# Altium PCB Board1.pcbdoc (part 2 of 2)
Units mil, origin at the board's own origin, x right, y up, seen from the top; angles counter-clockwise.
Board outline 3515.7 x 2641.7 mil, 2 copper layers (Top Layer, Bottom Layer), stack 62.2 mil thick; 78 components, 74 nets, 384 pads, 165 vias.
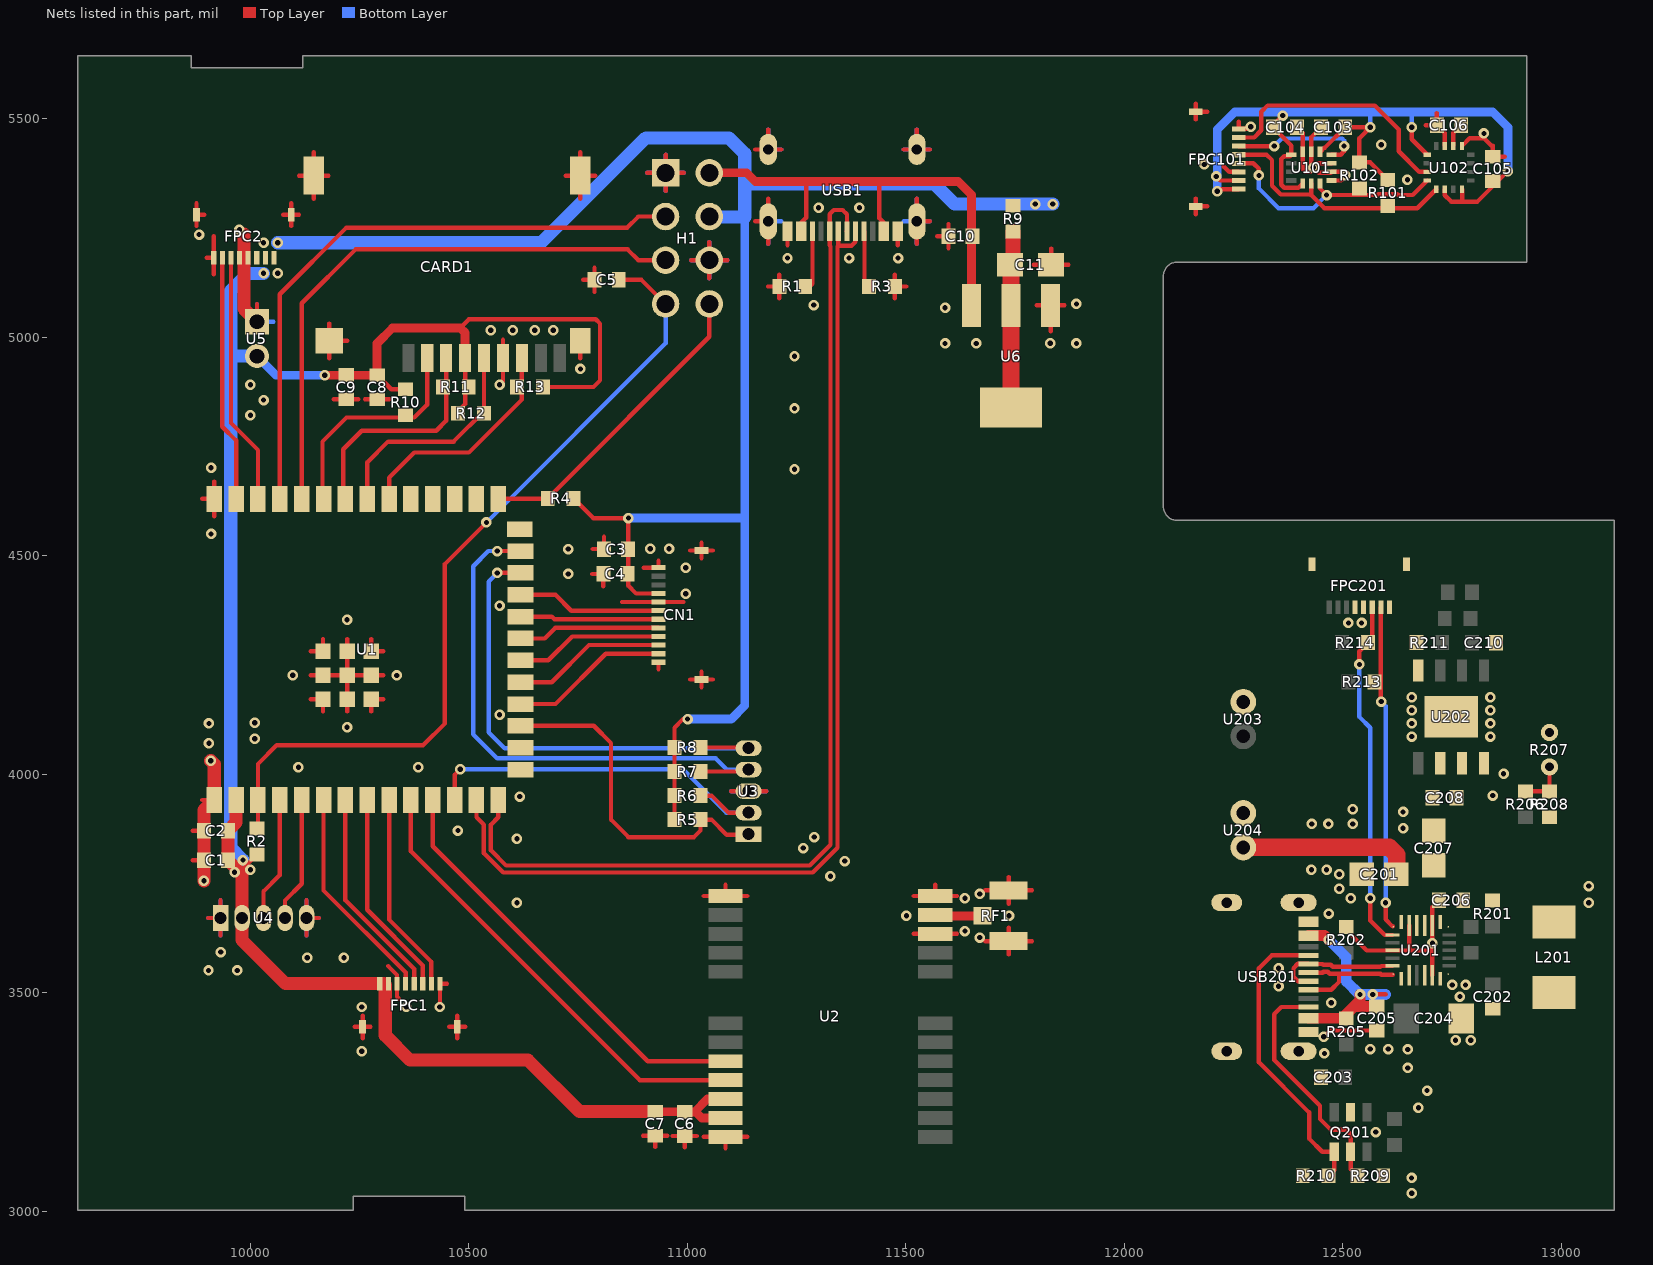
[diagram p2: the nets of this part, all layers, seen from the top]

## Via types
v1: diameter 24, hole 12, Top Layer to Bottom Layer, 165 vias

## Nets (pads, with @x,y where several pads share a name; then routed paths per layer and width w, separated by ;. In a path a pad name is that pad's centre, name@x,y a point inside that pad or via, vN(x,y) a via of type N, cw(c..) or ccw(c..) an arc to the next point about the centre after c; other vN are vias at no path point) (continued)
BAT/$1N68: R206.2 R207.1 R208.1 | length 113
  Top Layer w10: R206.2@12917.6,3960.6 R208.1@12972.6,3960.6 12972.6,4011.5 R207.1@12967.6,4016.5
BAT/CC1: Q201.4 R210.1 USB201.A5 | length 693.6
  Top Layer w10: USB201.A5@12421.1,3585.1 12336.8,3585.1 12307.6,3555.9 12307.6,3340.9 12422.6,3225.9 12422.6,3165.9 12452.8,3135.7 Q201.4@12480.2,3135.7 12480.2,3093.8 R210.1@12467.2,3080.9
BAT/CC2: Q201.5 R209.1 USB201.B5 | length 554.5
  Top Layer w10: USB201.B5@12421.1,3467 12358.7,3467 12342.6,3450.9 12342.6,3345.9 12447.6,3240.9 12447.6,3210.9 12472.6,3185.9 12507.6,3185.9 12517.6,3175.9 Q201.5@12517.6,3135.7 12517.6,3096.2 R209.1@12532.9,3080.9
BAT/GND: C201.2 C203.2 C204.2 C205.1 C206.2 C207.1 C208.1 C210.1 FPC201.1 FPC201.4 FPC201.5 FPC201.9 FPC201.10 Q201.2 R202.2 R207.2 R208.2 R209.2 R210.2 R211.1 U201.5 U201.6 U201.7 U201.15 U201.18 U201.23 U202.4 U202.9 U203.1 U204.1 USB201.13 USB201.14 USB201.15 USB201.16 USB201.A1B12 USB201.B1A12 | length 586.5
  Top Layer w10: v1(12456.3,3398.9) 12470.7,3413.3 C205.1@12577.6,3413.3 ; R202.2@12507.6,3650.6 12507.6,3643.4 12554.5,3596.5 12613.1,3596.5 12651.5,3596.5 ; U201.18@12651.5,3653.6 12651.5,3596.5 ; U201.5@12704.7,3539.4 12704.7,3595.2 ; C206.2@12720,3710.9 12704.7,3695.6 U201.15@12704.7,3653.6 v1(12704.7,3613.1) 12704.7,3595.2 ; 12651.5,3596.5 12703.5,3596.5 12704.7,3595.2
  other v1: 12657.6,3040.9 12657,3075.9 12575.2,3180.9 12672.6,3236.3 12692.6,3275.9 12648.4,3327.7 12457.6,3360.9 12648.4,3370 12562.6,3370.9 12603.8,3370.9 12757.6,3390.9 12792.6,3390.9 12473,3476.6 12767.6,3490.9 12352.6,3514.8 12750.1,3517.7 12780.7,3517.7 12352.6,3555.9 12467.6,3680.9 13062.6,3705.9 12517.6,3715.9 12491.5,3737.5 13062.6,3743.9 12491.5,3770.9 12428,3780.9 12462.6,3780.9 12637.6,3875.9 12428.6,3885.9 12466.7,3885.9 12522.6,3885.9 12637.6,3913.4 12522.6,3919.7 12842.6,3950.9 12867.6,4000.9 12657.6,4085.9 12837.6,4085.9 12657.6,4115.9 12837.6,4115.9 12657.6,4145.9 12837.6,4145.9 12657.6,4175.9 12837.6,4175.9 12512.6,4345.9 12542.6,4345.9
BAT/P_DN: U201.25 USB201.A7 USB201.B7 | length 292.5
  Top Layer w10: USB201.A7@12421.1,3526.1 12420.9,3525.9 12397,3525.9 12386.7,3536.2 12386.7,3555.9 12396.7,3565.9 12420.6,3565.9 USB201.B7@12421.1,3565.4 12453.5,3565.4 12455.3,3563.6 12472,3563.6 12476.4,3559.2 12585.5,3559.2 12587.4,3561 U201.25@12613.1,3561
BAT/P_DP: U201.1 U201.26 USB201.A6 USB201.B6 | length 292.1
  Top Layer w10: USB201.B6@12421.1,3506.4 12473,3506.4 12491,3524.3 12491,3543.2 ; USB201.A6@12421.1,3545.7 12453.5,3545.7 12455.3,3547.6 12465.3,3547.6 12469.8,3543.2 12491,3543.2 ; 12613.6,3541.3 12587.9,3541.3 12586,3543.2 12491,3543.2
BAT/SCL_B: FPC201.2 R213.2 U201.19 U201.20 | length 741.2
  Top Layer w10: FPC201.2@12586.8,4381.7 12586.8,4166.7 v1(12587.6,4165.9) ; v1(12597.6,3705.9) 12597.6,3667.7 12613.6,3651.6
  Bottom Layer w10: v1(12587.6,4165.9) 12597.6,4155.9 v1(12597.6,3705.9)
BAT/SDA_B: FPC201.3 R214.2 U201.21 | length 803.5
  Top Layer w10: v1(12537.6,4250.9) 12537.6,4280.9 12567.1,4310.4 FPC201.3@12567.1,4381.7 ; v1(12562.6,3715.9) 12562.6,3665 12595.7,3631.9 U201.21@12613.1,3631.9
  Bottom Layer w10: v1(12537.6,4250.9) 12537.6,4130.9 12562.6,4105.9 v1(12562.6,3715.9)
BAT/SW: C202.1 L201.2 U201.4
BAT/SYS: C207.2 C208.2 L201.1 U201.16 U202.6 U202.7 U202.8
BAT/VBAT: C201.1 U201.17 U204.2 | length 402.8
  Top Layer w40: U204.2@12271.9,3832.2 12606.3,3832.2 12622.6,3815.9 12622.6,3771.5 C201.1@12621.9,3770.9
BAT/VBUS: C205.2 R205.2 U201.2 USB201.A4B9 USB201.B4A9 | length 490.4
  Top Layer w10: v1@12572.6,3495.9 12597.6,3495.9
  Top Layer w25: USB201.B4A9@12421.1,3441.4 12498.1,3441.4 12525.1,3468.5 ; USB201.A4B9@12421.1,3630.4 12458.1,3630.4 v1(12467.6,3620.9) ; v1(12539.1,3495.9) 12539.1,3482.4 12525.1,3468.5 ; C205.2@12577.6,3468.5 12525.1,3468.5
  Bottom Layer w25: v1(12467.6,3620.9) 12507.6,3580.9 12507.6,3525.9 12537.6,3495.9 v1(12539.1,3495.9) v1(12568.1,3495.9) 12597.6,3495.9
BAT/VREF: C206.1 R201.1 U201.13 U201.14
MCU/3V3: C1.1 C2.1 C3.2 C4.2 C6.2 C7.2 C8.2 C9.2 CARD1.4 CN1.9 FPC1.1 FPC1.2 FPC2.1 FPC2.2 FPC2.3 H1.4 R2.2 R4.1 R5.1 R6.1 R7.1 R8.1 R9.1 R10.2 R11.2 R12.2 R13.2 U1.2 U2.22 U2.23 U4.2 U5.2 | length 9032.1
  Top Layer w10: 9980.8,3771.2 9980.8,3782 R2.2@10015,3816.2 ; C8.2@10289.9,4912.9 10322.2,4880.6 R10.2@10355,4880.6 ; R12.2@10475.3,4830.9 10491.3,4846.9 CARD1.4@10491.3,4952.2 ; 10480,5020.9 10500,5040.9 10790,5040.9 10800,5030.9 10800,4900.9 10785,4885.9 R13.2@10669.7,4885.9 ; R4.1@10739.7,4630.9 10784.7,4585.9 v1(10865,4585.9) 10865,4430.9 10882.5,4413.4 CN1.9@10933.7,4413.4 ; R5.1@10970.3,3895.9 R6.1@10970.3,3950.9 R7.1@10970.3,4005.9 R8.1@10970.3,4060.9 10970.3,4106.2 10990,4125.9 v1(11000.3,4125.9)
  Top Layer w20: v1(10170,4912.9) C8.2@10289.9,4912.9 10289.9,4985.8 10325,5020.9 10480,5020.9 10491.3,5009.6 CARD1.4@10491.3,4952.2 ; C7.2@10926,3227.6 10993,3227.6 C6.2@10993.7,3227 11016.1,3227 ; U2.23@11087.1,3213.1 11032.8,3213.1 11018.9,3227 11016.1,3227 ; U2.22@11087.1,3256.5 11045.5,3256.5 11016.1,3227
  Top Layer w30: U1.2@9967.3,3940.9 9967.3,3889.4 C2.1@9948.7,3870.8 C1.1@9948.7,3803.2 9980.8,3771.2 U4.2@9980.8,3670.9 9980.8,3620.1 10080,3520.9 10305,3520.9 10308.6,3517.3 10308.6,3402.3 10365,3345.9 10635,3345.9 10753.3,3227.6 C7.2@10926,3227.6
  Bottom Layer w20: U5.2@10015,4956.5 10058.7,4912.9 v1(10170,4912.9) ; v1(10865,4585.9) 11131.2,4585.9 ; v1(11000.3,4125.9) 11100,4125.9 11131.2,4157.1 11131.2,4585.9 ; 11131.2,5274.7 11131.2,4585.9
  Bottom Layer w30: v1(9982.9,3803.2) 9955,3831.1 9955,4954.3 ; U5.2@10015,4956.5 9957.2,4956.5 9955,4954.3 ; v1(10030,5145.9) 9995,5145.9 9955,5105.9 9955,4954.3 ; v1(10062.5,5215.9) 10665,5215.9 10905,5455.9 11095,5455.9 11131.2,5419.7 11131.2,5362.4 ; H1.4@11050,5275.9 11051.2,5274.7 11131.2,5274.7 11131.2,5362.4 ; v1(11836.1,5304.4) v1(11796.1,5304.4) 11611.5,5304.4 11565,5350.9 11142.7,5350.9 11131.2,5362.4
  other v1: 9963.7,3775.3 10000,3780.9 10062.8,5145.9 10030,5215.9
MCU/3V3L: C11.1 R9.2 U6.2 U6.4 | length 406.3
  Top Layer w35: C11.1@11737.8,5165.9 11745,5173.1 R9.2@11745,5241.2
  Top Layer w40: C11.1@11737.8,5165.9 11740.4,5163.3 U6.2@11740.4,5072.8 U6.4@11740.4,4839
MCU/5V: C10.2 H1.2 U6.3 USB1.A4B9 USB1.B4A9 | length 1109.9
  Top Layer w10: USB1.B4A9@11260.5,5242.4 11260.5,5261.9 11271.6,5273 11271.6,5355.9 ; 11438.6,5355.9 11439.2,5355.4 11439.2,5272.3 11449.5,5261.9 USB1.A4B9@11449.5,5242.4
  Top Layer w20: H1.2@11050,5375.9 11135,5375.9 11155,5355.9 11271.6,5355.9 11438.6,5355.9 11620,5355.9 11649.9,5326 U6.3@11649.9,5072.8
MCU/$1N51: RF1.1 U2.11 | length 108.3
  Top Layer w20.6: U2.11@11567.4,3677.7 11569.2,3675.9 RF1.1@11675,3675.9
MCU/$1N182: R3.1 USB1.A5 | length 127
  Top Layer w10: USB1.A5@11404.2,5242.4 11405.3,5241.3 R3.1@11405.3,5115.9
MCU/$1N183: R1.1 USB1.B5 | length 129.2
  Top Layer w10: R1.1@11279.7,5115.9 11286.1,5122.3 USB1.B5@11286.1,5242.4
MCU/DN: U1.13 USB1.A7 USB1.B7 | length 2459
  Top Layer w10: U1.13@10517.3,3940.9 10517.3,3901.4 10534.3,3884.4 10534.3,3819 10578.4,3774.9 11286.6,3774.9 11343.3,3831.6 11343.3,5208.1 11345.2,5210 ; USB1.A7@11345.2,5242.4 11345.2,5210 ; USB1.B7@11384.5,5242.4 11384.5,5218.2 11375.3,5209 11346.1,5209 11345.2,5210
MCU/DP: U1.14 USB1.A6 USB1.B6 | length 2463.4
  Top Layer w10: U1.14@10567.3,3940.9 10567.3,3901.4 10550.3,3884.4 10550.3,3825.6 10585,3790.9 11280,3790.9 11327.3,3838.2 11327.3,5208.1 11325.5,5210 USB1.B6@11325.5,5242.4 11325.5,5281.4 11335,5290.9 11355,5290.9 11365,5280.9 11365,5242.6 USB1.A6@11364.8,5242.4
MCU/EN: C5.2 H1.7 R2.1 U1.3 | length 1914
  Top Layer w10: R2.1@10015,3875.6 10017.3,3877.9 U1.3@10017.3,3940.9 10017.3,4023.2 10060,4065.9 10395,4065.9 10445,4115.9 10445,4480.9 v1(10540,4575.9) ; C5.2@10842.6,5130.9 10895,5130.9 H1.7@10950,5075.9
  Bottom Layer w10: v1(10540,4575.9) 10950,4985.9 H1.7@10950,5075.9
MCU/GND: C1.2 C2.2 C3.1 C4.1 C5.1 C6.1 C7.1 C8.1 C9.1 C10.1 C11.2 CARD1.6 CARD1.10 CARD1.11 CARD1.12 CARD1.13 CN1.1 CN1.8 CN1.12 CN1.13 CN1.14 FPC1.3 FPC1.8 FPC1.9 FPC1.10 FPC2.4 FPC2.5 FPC2.8 FPC2.9 FPC2.10 H1.1 H1.6 R1.2 R3.2 RF1.2 RF1.3 U1.1 U1.40 U1.41 U2.10 U2.12 U2.13 U2.24 U3.3 U4.1 U4.5 U5.1 U6.1 USB1.13 USB1.14 USB1.15 USB1.16 USB1.A1B12 USB1.B1A12 | length 7199.2
  Top Layer w10: 9867.8,3803.2 C1.2@9893.6,3803.2 ; 9867.8,3870.8 C2.2@9893.6,3870.8 9893.6,3843 ; 9876.7,5254.3 FPC2.9@9876.7,5280.1 ; 9876.7,5306 FPC2.9@9876.7,5280.1 ; 9889.5,3940.9 U1.1@9917.3,3940.9 9917.3,3980.6 ; 9889.5,4629.9 U1.40@9917.3,4629.9 ; 9893.6,3775.4 C1.2@9893.6,3803.2 ; 9893.6,3831 C1.2@9893.6,3803.2 ; 9894.7,5280.1 FPC2.9@9876.7,5280.1 ; 9900.1,5181.7 FPC2.8@9910.2,5181.7 ; 9903.8,3670.9 U4.1@9931.6,3670.9 ; 9916.1,5143.7 9916.1,5230.9 ; 9917.3,4590.3 U1.40@9917.3,4629.9 ; 9917.3,4669.6 U1.40@9917.3,4629.9 ; 9931.6,3630.8 U4.1@9931.6,3670.9 ; 9931.6,3711 U4.1@9931.6,3670.9 ; FPC2.5@9975.2,5181.7 9975.2,5245.7 9994.8,5226.1 FPC2.4@9994.8,5181.7 ; U5.1@10015,5035.3 10015,5074.9 ; 10075.3,5280.1 FPC2.10@10093.3,5280.1 ; 10093.3,5254.3 FPC2.10@10093.3,5280.1 ; 10093.3,5306 FPC2.10@10093.3,5280.1 ; 10111.2,5280.1 FPC2.10@10093.3,5280.1 ; 10111.2,5369.6 CARD1.12@10144.9,5369.6 ; 10128.4,3630.8 U4.5@10128.4,3670.9 ; 10128.4,3711 U4.5@10128.4,3670.9 ; 10138.3,4171.3 U1.41@10166.1,4171.3 10166.1,4143.4 ; 10138.3,4226.4 U1.41@10166.1,4226.4 U1.41@10221.2,4226.4 ; 10138.3,4281.5 U1.41@10166.1,4281.5 10166.1,4309.3 ; 10144.9,5316.2 CARD1.12@10144.9,5369.6 ; 10144.9,5423 CARD1.12@10144.9,5369.6 ; 10156.2,3670.9 U4.5@10128.4,3670.9 ; 10178.6,5369.6 CARD1.12@10144.9,5369.6 ; 10180.3,4952 CARD1.13@10180.3,4991.6 ; 10180.3,5031.2 CARD1.13@10180.3,4991.6 ; 10191.1,4858 C9.1@10218.9,4858 10246.7,4858 ; 10221.2,4143.4 U1.41@10221.2,4171.3 U1.41@10221.2,4226.4 ; 10221.2,4309.3 U1.41@10221.2,4281.5 U1.41@10221.2,4226.4 ; 10221.9,4991.6 CARD1.13@10180.3,4991.6 ; 10238.8,3421.7 FPC1.10@10256.7,3421.7 ; 10256.7,3395.8 FPC1.10@10256.7,3421.7 ; 10256.7,3447.5 FPC1.10@10256.7,3421.7 ; 10262.1,4857.7 C8.1@10289.9,4857.7 10317.7,4857.7 ; 10274.7,3421.7 FPC1.10@10256.7,3421.7 ; 10276.3,4143.4 U1.41@10276.3,4171.3 10304.2,4171.3 ; 10276.3,4309.3 U1.41@10276.3,4281.5 10304.2,4281.5 ; 10304.2,4226.4 U1.41@10276.3,4226.4 U1.41@10221.2,4226.4 ; 10315,3560.9 10335.5,3540.4 FPC1.3@10335.5,3520.1 10335.5,3490.4 10340,3485.9 ; v1(10433.4,3467.1) 10433.9,3467.6 FPC1.8@10433.9,3520.1 ; 10439.8,3520.1 10449.9,3520.1 ; 10455.3,3421.7 FPC1.9@10473.3,3421.7 ; 10473.3,3395.8 FPC1.9@10473.3,3421.7 ; 10473.3,3447.5 FPC1.9@10473.3,3421.7 ; 10491.2,3421.7 FPC1.9@10473.3,3421.7 ; v1(10570,4890.9) 10578,4898.9 CARD1.6@10578,4952.2 ; 10578,4910.6 CARD1.6@10578,4952.2 ; 10578,4993.8 CARD1.6@10578,4952.2 ; 10721.4,5369.6 CARD1.11@10755.1,5369.6 ; 10755.1,4952 CARD1.10@10755.1,4991.6 ; 10755.1,5316.2 CARD1.11@10755.1,5369.6 ; 10755.1,5423 CARD1.11@10755.1,5369.6 ; 10761.6,5130.9 C5.1@10787.4,5130.9 ; 10782,4458 C4.1@10807.8,4458 10807.8,4430.2 ; 10783.2,4515 C3.1@10809.1,4515 10809.1,4542.9 ; 10787.4,5103.1 C5.1@10787.4,5130.9 ; 10787.4,5158.7 C5.1@10787.4,5130.9 ; 10788.8,5369.6 CARD1.11@10755.1,5369.6 ; 10850.3,4393.7 10991,4393.7 ; 10898.2,3172.5 C7.1@10926,3172.5 ; 10900,4472.4 CN1.12@10933.7,4472.4 ; 10908.4,5375.9 H1.1@10950,5375.9 ; 10926,3146.7 C7.1@10926,3172.5 ; 10933.7,4239.9 CN1.1@10933.7,4250 ; 10933.7,4478.3 10933.7,4488.4 ; 10950,5334.3 H1.1@10950,5375.9 ; 10950,5417.5 H1.1@10950,5375.9 ; 10953.8,3172.5 C7.1@10926,3172.5 ; 10965.9,3171.9 C6.1@10993.7,3171.9 ; 10991.6,5375.9 H1.1@10950,5375.9 ; 10993.7,3146 C6.1@10993.7,3171.9 ; 11006.3,4216.5 CN1.14@11032.2,4216.5 ; 11006.3,4511.8 CN1.13@11032.2,4511.8 ; 11008.4,5175.9 H1.6@11050,5175.9 ; 11021.5,3171.9 C6.1@10993.7,3171.9 ; 11032.2,4198.6 CN1.14@11032.2,4216.5 ; 11032.2,4234.5 CN1.14@11032.2,4216.5 ; 11032.2,4493.8 CN1.13@11032.2,4511.8 ; 11032.2,4529.8 CN1.13@11032.2,4511.8 ; 11037.6,3169.8 U2.24@11087.1,3169.8 ; 11037.6,3721 U2.13@11087.1,3721 ; 11050,5134.3 H1.6@11050,5175.9 ; 11050,5217.5 H1.6@11050,5175.9 ; 11058,4216.5 CN1.14@11032.2,4216.5 ; 11058,4511.8 CN1.13@11032.2,4511.8 ; 11087.1,3144 U2.24@11087.1,3169.8 ; 11087.1,3746.9 U2.13@11087.1,3721 ; 11091.6,5175.9 H1.6@11050,5175.9 ; 11099.9,3960.9 U3.3@11140,3960.9 11180.1,3960.9 ; 11136.5,3169.8 U2.24@11087.1,3169.8 ; 11136.5,3721 U2.13@11087.1,3721 ; 11155.1,5264.8 USB1.13@11184.9,5264.8 ; 11155.1,5429.4 USB1.14@11184.9,5429.4 ; 11184.4,5115.9 R1.2@11210.3,5115.9 ; 11184.9,5213.4 USB1.13@11184.9,5264.8 ; 11184.9,5316.3 USB1.13@11184.9,5264.8 ; 11184.9,5474.9 USB1.14@11184.9,5429.4 ; 11210.3,5088.8 R1.2@11210.3,5115.9 ; 11210.3,5143 R1.2@11210.3,5115.9 ; 11214.7,5429.4 USB1.14@11184.9,5429.4 ; 11229,5209.9 USB1.B1A12@11229,5242.4 ; 11474.7,5088.8 R3.2@11474.7,5115.9 ; 11474.7,5143 R3.2@11474.7,5115.9 ; 11481,5209.9 USB1.A1B12@11481,5242.4 ; 11495.3,5429.4 USB1.15@11525.1,5429.4 ; 11500.6,5115.9 R3.2@11474.7,5115.9 ; 11517.9,3634.4 U2.10@11567.4,3634.4 11616.8,3634.4 ; 11517.9,3721 U2.12@11567.4,3721 ; 11525.1,5213.4 USB1.16@11525.1,5264.8 ; 11525.1,5316.3 USB1.16@11525.1,5264.8 ; 11525.1,5474.9 USB1.15@11525.1,5429.4 ; 11554.9,5264.8 USB1.16@11525.1,5264.8 ; 11554.9,5429.4 USB1.15@11525.1,5429.4 ; 11567.4,3746.9 U2.12@11567.4,3721 ; 11571.6,5230.9 C10.1@11597.4,5230.9 ; 11597.4,5203.1 C10.1@11597.4,5230.9 ; 11597.4,5258.7 C10.1@11597.4,5230.9 ; 11616.8,3721 U2.12@11567.4,3721 ; 11681.6,3617.8 RF1.2@11735,3617.8 ; 11681.6,3734 RF1.3@11735,3734 ; 11735,3587.1 RF1.2@11735,3617.8 ; 11735,3648.6 RF1.2@11735,3617.8 ; 11735,3703.2 RF1.3@11735,3734 ; 11735,3764.7 RF1.3@11735,3734 ; 11788.4,3617.8 RF1.2@11735,3617.8 ; 11788.4,3734 RF1.3@11735,3734 ; 11792.6,5165.9 C11.2@11832.2,5165.9 ; 11799.2,5072.8 U6.1@11831,5072.8 ; 11831,5013.5 U6.1@11831,5072.8 ; 11832.2,5202.8 C11.2@11832.2,5165.9 ; 11862.7,5072.8 U6.1@11831,5072.8 ; 11871.9,5165.9 C11.2@11832.2,5165.9
  Top Layer w30: v1(9893.6,3755.9) C1.2@9893.6,3803.2 C2.2@9893.6,3870.8 9893.6,3917.3 U1.1@9917.3,3940.9 9917.3,4022.6 v1(9909.2,4030.7) ; 9985,5235.9 9985,5065.3 U5.1@10015,5035.3
  Bottom Layer w10: 9903.8,3670.9 U4.1@9931.6,3670.9 ; 9931.6,3630.8 U4.1@9931.6,3670.9 ; 9931.6,3711 U4.1@9931.6,3670.9 ; 10015,5074.9 U5.1@10015,5035.3 10052.7,5035.3 ; 10128.4,3630.8 U4.5@10128.4,3670.9 ; 10128.4,3711 U4.5@10128.4,3670.9 ; 10156.2,3670.9 U4.5@10128.4,3670.9 ; 10908.4,5375.9 H1.1@10950,5375.9 ; 10950,5334.3 H1.1@10950,5375.9 ; 10950,5417.5 H1.1@10950,5375.9 ; 10991.6,5375.9 H1.1@10950,5375.9 ; 11008.4,5175.9 H1.6@11050,5175.9 ; 11050,5134.3 H1.6@11050,5175.9 ; 11050,5217.5 H1.6@11050,5175.9 ; 11091.6,5175.9 H1.6@11050,5175.9 ; 11099.9,3960.9 U3.3@11140,3960.9 11180.1,3960.9 ; 11184.9,5213.4 USB1.13@11184.9,5264.8 11214.7,5264.8 ; 11184.9,5474.9 USB1.14@11184.9,5429.4 11214.7,5429.4 ; 11495.3,5264.8 USB1.16@11525.1,5264.8 ; 11495.3,5429.4 USB1.15@11525.1,5429.4 ; 11525.1,5213.4 USB1.16@11525.1,5264.8 ; 11525.1,5316.3 USB1.16@11525.1,5264.8 ; 11525.1,5474.9 USB1.15@11525.1,5429.4 ; 11554.9,5264.8 USB1.16@11525.1,5264.8 ; 11554.9,5429.4 USB1.15@11525.1,5429.4
  other v1: 10255,3365.9 10255,3467.1 10356.5,3467.1 9904.1,3550.9 9970,3550.9 10129.8,3579.6 10213.9,3579.6 9931.9,3592.9 11669,3625.9 11635,3640.9 11501.1,3675.9 11735.9,3675.9 10610,3705.9 11635,3715.9 11669,3725.9 11327.2,3766.5 11360,3800.9 11265,3830.9 10610,3851.9 11290,3855.9 10475,3870.9 10616.5,3948.6 10110,4015.9 10384.3,4015.9 9905,4070.9 10010,4080.9 10221.2,4107.1 9905,4115.9 10010,4117.3 10570,4135.9 10096.7,4226.4 10335,4225.9 10221.2,4353.2 10570,4385.4 10996.3,4412.6 10727.2,4458 10996.3,4472.4 10727.2,4515 10915,4515.9 10958,4515.9 9910,4549.7 11245,4697.7 9910,4700.9 10000,4820.9 11245,4836.7 10030,4855.9 10000,4890.9 10755.1,4927.2 11245,4955.9 11589.4,4985.6 11661.1,4985.6 11830,4985.9 11890,4985.6 10550,5015.9 10600.4,5015.9 10650.4,5015.9 10693.2,5015.9 11589.4,5066.9 11289,5073.4 11890,5075.9 11229,5180.9 11370,5180.9 11482,5180.9 9882.6,5234.7 9975,5245.9 11300,5295.9 11393.6,5295.9
MCU/GPIO_00: H1.8 R4.2 U1.27 | length 711.6
  Top Layer w10: U1.27@10567.3,4629.9 10679.4,4629.9 R4.2@10680.3,4630.9 11050,5000.6 H1.8@11050,5075.9
MCU/GPIO_01: FPC2.7 U1.39 | length 564.8
  Top Layer w10: FPC2.7@9935.8,5181.7 9935.8,4795.1 9967.3,4763.6 U1.39@9967.3,4629.9
MCU/GPIO_02: FPC2.6 U1.38 | length 577.4
  Top Layer w10: FPC2.6@9955.5,5181.7 9955.5,4803.3 10017.3,4741.5 U1.38@10017.3,4629.9
MCU/GPIO_03: U1.15
MCU/GPIO_04: U1.4 U4.3 | length 285.5
  Top Layer w10: U4.3@10030,3670.9 10030,3731.6 10067.3,3768.9 U1.4@10067.3,3940.9
MCU/GPIO_05: U1.5 U4.4 | length 285.8
  Top Layer w10: U4.4@10079.2,3670.9 10079.2,3710.9 10117.3,3749 U1.5@10117.3,3940.9
MCU/GPIO_06: FPC1.4 U1.6 | length 498.7
  Top Layer w10: U1.6@10167.3,3940.9 10167.3,3733.7 10355.2,3545.9 FPC1.4@10355.2,3520.1
MCU/GPIO_07: FPC1.5 U1.7 | length 486
  Top Layer w10: U1.7@10217.3,3940.9 10217.3,3711.6 10374.8,3554 FPC1.5@10374.8,3520.1
MCU/GPIO_08: R6.2 U1.12 U3.2 | length 902.9
  Top Layer w10: U1.12@10467.3,3940.9 10467.3,3998.2 v1(10480,4010.9) ; R6.2@11029.7,3950.9 11055,3950.9 11094.2,3911.7 U3.2@11140,3911.7
  Bottom Layer w10: v1(10480,4010.9) 10990,4010.9 11089.2,3911.7 U3.2@11140,3911.7
MCU/GPIO_09: R5.2 U1.17 U3.1 | length 777
  Top Layer w10: U1.17@10617.7,4110.4 10785.5,4110.4 10825,4070.9 10825,3895.9 10865,3855.9 11015,3855.9 11030,3870.9 11030,3895.6 R5.2@11029.7,3895.9 11055,3895.9 11090,3860.9 11138.4,3860.9 U3.1@11140,3862.5
MCU/GPIO_10: CN1.2 U1.18 | length 363.7
  Top Layer w10: U1.18@10617.7,4160.4 10698,4160.4 10813.1,4275.6 CN1.2@10933.7,4275.6
MCU/GPIO_11: CN1.3 U1.19 | length 351.2
  Top Layer w10: U1.19@10617.7,4210.4 10689.8,4210.4 10774.7,4295.3 CN1.3@10933.7,4295.3
MCU/GPIO_12: CN1.4 U1.20 | length 338.6
  Top Layer w10: U1.20@10617.7,4260.4 10681.7,4260.4 10736.2,4315 CN1.4@10933.7,4315
MCU/GPIO_13: CN1.5 U1.21 | length 326
  Top Layer w10: U1.21@10617.7,4310.4 10673.5,4310.4 10697.7,4334.6 CN1.5@10933.7,4334.6
MCU/GPIO_14: CN1.6 U1.22 | length 318.5
  Top Layer w10: U1.22@10617.7,4360.4 10689.8,4360.4 10695.9,4354.3 CN1.6@10933.7,4354.3
MCU/GPIO_15: FPC1.6 U1.8 | length 473.5
  Top Layer w10: U1.8@10267.3,3940.9 10267.3,3689.4 10394.5,3562.2 FPC1.6@10394.5,3520.1
MCU/GPIO_16: FPC1.7 U1.9 | length 460.9
  Top Layer w10: U1.9@10317.3,3940.9 10317.3,3667.3 10414.2,3570.3 FPC1.7@10414.2,3520.1
MCU/GPIO_17: U1.10 U2.21 | length 1054.1
  Top Layer w10: U1.10@10367.3,3940.9 10367.3,3823.6 10891.1,3299.8 U2.21@11087.1,3299.8
MCU/GPIO_18: U1.11 U2.20 | length 979.5
  Top Layer w10: U1.11@10417.3,3940.9 10417.3,3834.9 10909.1,3343.1 U2.20@11087.1,3343.1
MCU/GPIO_21: CN1.7 U1.23 | length 331.1
  Top Layer w10: U1.23@10617.7,4410.4 10698,4410.4 10734.4,4374 CN1.7@10933.7,4374
MCU/GPIO_35: U1.28
MCU/GPIO_36: U1.29
MCU/GPIO_37: U1.30
MCU/GPIO_38: U1.31
MCU/GPIO_39: CARD1.7 R13.1 U1.32 | length 521.4
  Top Layer w10: U1.32@10317.3,4629.9 10317.3,4678.2 10375,4735.9 10500,4735.9 10621.3,4857.2 CARD1.7@10621.3,4952.2
MCU/GPIO_40: CARD1.5 R12.1 U1.33 | length 520.9
  Top Layer w10: U1.33@10267.3,4629.9 10267.3,4713.2 10315,4760.9 10465,4760.9 10534.6,4830.5 CARD1.5@10534.6,4952.2
MCU/GPIO_41: CARD1.3 R11.1 U1.34 | length 521.6
  Top Layer w10: U1.34@10217.3,4629.9 10212.3,4634.9 10212.3,4743.2 10255,4785.9 10425,4785.9 10448,4808.9 CARD1.3@10448,4952.2
MCU/GPIO_42: CARD1.2 R10.1 U1.35 | length 513.3
  Top Layer w10: U1.35@10167.3,4629.9 10165,4632.2 10165,4760.9 10220,4815.9 10375,4815.9 10404.7,4845.6 CARD1.2@10404.7,4952.2
MCU/GPIO_45: U1.26
MCU/GPIO_46: U1.16
MCU/GPIO_47: R8.2 U1.24 U3.5 | length 1146.6
  Top Layer w10: v1(10565,4460.4) U1.24@10617.7,4460.4 ; R8.2@11029.7,4060.9 11138.4,4060.9 U3.5@11140,4059.3
  Bottom Layer w10: v1(10565,4460.4) 10545,4440.4 10545,4095.9 10581.6,4059.3 U3.5@11140,4059.3
MCU/GPIO_48: R7.2 U1.25 U3.4 | length 1282.5
  Top Layer w10: v1(10565,4510.4) U1.25@10617.7,4510.4 ; R7.2@11029.7,4005.9 11135.8,4005.9 U3.4@11140,4010.1
  Bottom Layer w10: v1(10565,4510.4) 10544.5,4510.4 10510,4475.9 10510,4090.9 10565,4035.9 11065,4035.9 11090.8,4010.1 U3.4@11140,4010.1
MCU/RXD0: H1.5 U1.36 | length 1341.5
  Top Layer w10: U1.36@10117.3,4629.9 10117.3,5077.5 10240.4,5200.6 10863.1,5200.6 10887.8,5175.9 H1.5@10950,5175.9
MCU/TXD0: H1.3 U1.37 | length 1424.6
  Top Layer w10: U1.37@10067.3,4629.9 10067.3,5098.2 10219.6,5250.6 10862.4,5250.6 10887.8,5275.9 H1.3@10950,5275.9
MMU/3V3: C103.2 C104.2 C105.2 FPC101.7 FPC101.8 R101.1 R102.1 U101.5 U101.8 U101.12 U102.2 U102.4 U102.13 | length 1983.5
  Top Layer w10: v1(12210.1,5367.5) 12219.3,5358.3 FPC101.7@12261.8,5358.3 ; v1(12212.6,5333.6) 12217.6,5338.6 FPC101.8@12261.8,5338.6 ; v1(12362.1,5507) 12340,5484.9 C104.2@12340,5480 12381.8,5438.2 U101.8@12381.8,5417.3 12378.4,5414 12365.4,5414 12359,5407.5 12359,5348.4 12365.4,5342 12398.1,5342 12407.7,5351.6 U101.12@12408.1,5351.6 ; U101.5@12447.5,5424 12447.9,5424 12457.5,5433.6 12458.8,5433.6 C103.2@12505.1,5480 v1(12562.6,5480) 12537.6,5455 R102.1@12537.6,5399.7 12562.6,5399.7 R101.1@12602.6,5359.7 ; v1(12657.6,5480) 12657.6,5452.8 U102.13@12693.1,5417.3 ; U102.2@12733,5338.1 12733,5324.6 12747.6,5310 12771.4,5310 ; U102.4@12772.3,5338.1 12772.6,5337.8 12772.6,5311.2 12771.4,5310 ; v1(12877.6,5380) 12807.6,5310 12771.4,5310
  Bottom Layer w10: 12560.9,5515 12562.6,5513.3 v1(12562.6,5480) ; v1(12657.6,5480) 12657.6,5512.8 12659.7,5515
  Bottom Layer w20: v1(12212.6,5333.6) 12212.6,5475 12252.6,5515 12560.9,5515 12659.7,5515 12842.6,5515 12877.6,5480 v1(12877.6,5380)
MMU/$1N27: C106.2 U102.10 | length 54.7
  Top Layer w10: U102.10@12752.6,5437.5 12752.6,5467.5 C106.2@12770.1,5485
MMU/GND: C103.1 C104.1 C105.1 C106.1 FPC101.1 FPC101.6 FPC101.9 FPC101.10 U101.1 U101.2 U101.3 U101.6 U101.7 U102.9 U102.11 | length 846
  Top Layer w10: 12163.3,5281.2 FPC101.9@12163.3,5299.2 ; 12163.3,5317.2 FPC101.9@12163.3,5299.2 ; 12163.3,5497.8 FPC101.10@12163.3,5515.8 ; 12163.3,5533.7 FPC101.10@12163.3,5515.8 ; 12189.2,5299.2 FPC101.9@12163.3,5299.2 ; 12189.2,5515.8 FPC101.10@12163.3,5515.8 ; 12227.6,5390 12239.6,5378 FPC101.6@12261.8,5378 ; FPC101.1@12261.8,5476.4 12283.9,5476.4 v1(12288.9,5481.4) ; 12261.8,5482.3 12261.8,5492.4 ; C104.1@12395.1,5480 12408.1,5467 U101.7@12408.1,5424 12408.1,5385 12415.2,5377.9 12425.2,5377.9 12432.3,5385 v1(12432.3,5387.8) ; C103.1@12450,5480 12427.8,5457.8 U101.6@12427.8,5424 12427.8,5392.3 v1(12432.3,5387.8) ; U101.1@12473.9,5358.3 12495.8,5358.3 ; U101.3@12473.9,5397.7 12442.2,5397.7 v1(12432.3,5387.8) ; 12495.8,5378 U101.2@12473.9,5378 12471.9,5375.9 12444.2,5375.9 v1(12432.3,5387.8) ; 12689.2,5485 C106.1@12715,5485 ; 12715,5512.8 C106.1@12715,5485 ; U102.11@12733,5437.5 12733,5467 C106.1@12715,5485 ; U102.9@12772.3,5437.5 12789.8,5455 12822.6,5455 12842.6,5435 C105.1@12842.6,5412.6 ; 12842.6,5438.4 C105.1@12842.6,5412.6 ; 12870.4,5412.6 C105.1@12842.6,5412.6
  other v1: 12647.6,5360 12505,5370 12182.6,5395 12587.6,5440 12822.6,5466.1
MMU/IMU_INT: FPC101.3 U101.4 | length 306.6
  Top Layer w10: FPC101.3@12261.8,5437 v1(12342.6,5437) ; U101.4@12473.9,5417.3 12494.9,5417.3 12502.6,5425 v1(12502.6,5437)
  Bottom Layer w10: v1(12342.6,5437) 12359.9,5454.3 12498.2,5454.3 12502.6,5450 v1(12502.6,5437)
MMU/MMU_INT: FPC101.2 U102.15 | length 578.8
  Top Layer w10: FPC101.2@12261.8,5456.7 12296.8,5456.7 12313.3,5473.2 12313.3,5515.7 12327.6,5530 12572.6,5530 12627.6,5475 12627.6,5425 12674.6,5378 U102.15@12693.1,5378
MMU/SCL: FPC101.4 R101.2 U101.13 U102.1 | length 581.3
  Top Layer w10: FPC101.4@12261.8,5417.3 12325.2,5417.3 12337.6,5405 12337.6,5346.3 12357.6,5326.3 12426.3,5326.3 12427.8,5324.7 ; U101.13@12427.8,5351.6 12427.8,5324.7 ; U102.1@12713.3,5338.1 12670.2,5295 12457.6,5295 12427.8,5324.7
MMU/SDA: FPC101.5 R102.2 U101.14 U102.16 | length 561.1
  Top Layer w10: FPC101.5@12261.8,5397.6 12294.9,5397.6 12307.6,5385 v1(12307.6,5370) ; U101.14@12447.5,5351.6 12447.5,5340 v1(12462.6,5325) 12578.8,5325 12581,5327.2 12624.1,5327.2 12626.3,5325 12659.8,5325 U102.16@12693.1,5358.3
  Bottom Layer w10: v1(12307.6,5370) 12307.6,5340 12352.6,5295 12432.6,5295 v1(12462.6,5325)
pads on no net: CARD1.1 CARD1.8 CARD1.CD CN1.10 CN1.11 Q201.3 U2.1 U2.2 U2.3 U2.4 U2.5 U2.6 U2.7 U2.8 U2.9 U2.14 U2.15 U2.16 U2.17 U2.18 U2.19 U101.9 U101.10 U101.11 U102.3 U102.5 U102.6 U102.7 U102.8 U102.12 U102.14 U201.9 U201.10 U202.5 USB1.A8 USB1.B8 USB201.A8 USB201.B8

## Keep-outs
Top Layer:
  region: 12880.2,3687.2 12880.2,3474.6 13084.9,3474.6 13084.9,3687.2
Board Outline Layer:
  drawing of 1081 lines, arcs and shapes, not listed
  text "CNC" at 9920,5659.4 h35.4
  text "CNC" at 12935.7,5364.2 h35.4
  text "CNC" at 12360.9,4852.4 h35.4
  text "V-CUT" at 11979,4773.6 h31.5
  text "V-CUT" at 12128.6,4773.6 h31.5
  text "CNC" at 11983,4301.2 h35.4
  text "CNC" at 10274.3,3009.8 h35.4

## Other copper
Top Layer:
  drawing of 354 lines, arcs and shapes, not listed
Bottom Layer:
  region net MCU/3V3: 10010,5195.9 10010,5225.9 10018.8,5234.7 10072.4,5234.7 10080,5227.2 10080,5135.9 10075,5130.9 10015,5130.9 10010,5135.9
  region net MCU/3V3: 9935,3819 9985.9,3819 9997.3,3830.4 10030.7,3830.4 10030.7,3796.9 9995.6,3761.8 9951.9,3761.8 9935,3778.7
  region net MCU/EN: 10955,5033 10945,5033 10943.4,5035.2 10939.2,5040.3 10926.4,5055.1 10973.6,5055.1 10960.8,5040.3 10956.6,5035.2
  region net MCU/3V3: 11093.8,5289.7 11092,5259.7 11089.5,5259.5 11086.7,5259 11083.7,5258.2 11080.6,5257.1 11077.5,5255.9 11074.6,5254.5 11072.1,5253 11069.9,5251.5 11071.7,5298.7 11073.8,5297 11076.3,5295.4 11079.1,5293.9 11082.2,5292.5 11085.3,5291.4 11088.3,5290.5 11091.2,5289.9
  region net MCU/GPIO_47: 11100.2,4054.3 11100.2,4064.3 11101.7,4064.5 11103.6,4065 11105.6,4065.7 11107.7,4066.7 11109.8,4067.8 11111.8,4069.1 11113.6,4070.4 11115.2,4071.8 11115.2,4046.8 11113.6,4048.2 11111.8,4049.6 11109.8,4050.9 11107.7,4052 11105.6,4052.9 11103.6,4053.7 11101.7,4054.2
  region net MCU/GPIO_48: 11100.2,4005.1 11100.2,4015.1 11101.7,4015.3 11103.6,4015.8 11105.6,4016.5 11107.7,4017.5 11109.8,4018.6 11111.8,4019.9 11113.6,4021.2 11115.2,4022.6 11115.2,3997.6 11113.6,3999 11111.8,4000.4 11109.8,4001.6 11107.7,4002.8 11105.6,4003.7 11103.6,4004.5 11101.7,4005
  region net MCU/GPIO_08: 11100.2,3906.7 11100.2,3916.7 11101.7,3916.9 11103.6,3917.3 11105.6,3918.1 11107.7,3919 11109.8,3920.2 11111.8,3921.4 11113.6,3922.8 11115.2,3924.2 11115.2,3899.2 11113.6,3900.6 11111.8,3901.9 11109.8,3903.2 11107.7,3904.3 11105.6,3905.3 11103.6,3906 11101.7,3906.5
  region net MCU/3V3: 9977.5,4941.5 9977.5,4971.5 9980,4971.7 9982.8,4972 9985.6,4972.6 9988.3,4973.3 9991,4974.2 9993.3,4975.1 9995.3,4976.1 9996.8,4977.2 9996.8,4935.9 9995.3,4936.9 9993.3,4937.9 9991,4938.9 9988.3,4939.8 9985.6,4940.5 9982.8,4941 9980,4941.4
  region net MCU/3V3: 10048.6,4937.1 10034.5,4922.9 10033.1,4923.9 10031.2,4924.9 10028.8,4925.8 10025.9,4926.7 10022.8,4927.6 10019.6,4928.2 10016.4,4928.7 10013.3,4929 10042.5,4958.3 10042.8,4955.1 10043.3,4951.9 10044,4948.7 10044.8,4945.6 10045.7,4942.8 10046.6,4940.3 10047.6,4938.4
  region net MCU/3V3: 10155.6,4902.9 10155.6,4922.9 10157.7,4922.9 10159.9,4923.2 10163.9,4923.9 10167.3,4924.5 10170,4924.9 10170,4900.8 10167.3,4901.2 10163.9,4901.8 10159.9,4902.5 10157.7,4902.8
  region net MCU/3V3: 10879.4,4595.9 10879.4,4575.9 10877.3,4575.8 10875.1,4575.6 10871.1,4574.9 10867.7,4574.2 10865,4573.9 10865,4597.9 10867.7,4597.6 10871.1,4596.9 10875.1,4596.2 10877.3,4596
  region net MCU/GPIO_08: 10496.3,4015.9 10496.3,4005.9 10494.5,4005.6 10492.3,4004.7 10489.9,4003.4 10487.9,4001.9 10487.9,4019.9 10489.9,4018.4 10492.3,4017.2 10494.5,4016.2
  region net MCU/GPIO_47: 10557,4445.3 10549.9,4452.4 10550.9,4453.9 10551.9,4456.2 10552.6,4458.7 10553,4461.2 10565.8,4448.4 10563.3,4448.1 10560.7,4447.3 10558.5,4446.4
  region net MCU/GPIO_48: 10548.7,4505.4 10548.7,4515.4 10550.5,4515.8 10552.7,4516.7 10555.1,4518 10557.1,4519.4 10557.1,4501.4 10555.1,4502.9 10552.7,4504.2 10550.5,4505.1
  region net MCU/3V3: 11014.7,4135.9 11014.7,4115.9 11012.6,4115.8 11010.5,4115.6 11006.5,4114.9 11003,4114.2 11000.3,4113.9 11000.3,4137.9 11003,4137.6 11006.5,4136.9 11010.5,4136.2 11012.6,4136
  region net MCU/EN: 10548,4591 10555.1,4583.9 10554.1,4582.4 10553.1,4580.2 10552.4,4577.6 10552,4575.2 10539.2,4587.9 10541.7,4588.3 10544.3,4589 10546.5,4590
  region net MCU/3V3: 10015,4971.5 10015,4941.5 10009.3,4941.2 10003.6,4940.2 9998.2,4938.5 9992.9,4936.2 9988,4933.3 9983.4,4929.9 9979.3,4925.9 9975.6,4921.5 9972.5,4916.7 9970,4911.5 9955,4954.3 9970,5001.5 9972.5,4996.4 9975.6,4991.6 9979.3,4987.1 9983.4,4983.2 9988,4979.7 9992.9,4976.8 9998.2,4974.5 10003.6,4972.9 10009.3,4971.9
  region net MCU/3V3: 11116.2,5362.4 11143.3,5265.8 11141.2,5173.5 11121.2,5169.7 11120.9,5177.9 11119.8,5186 11118,5194 11115.5,5201.8 11112.3,5209.3 11108.5,5216.5 11104.1,5223.4 11099.1,5229.9 11093.5,5235.9 11087.4,5241.3 11080.9,5246.3 11073.9,5250.6 11066.6,5254.3 11059,5257.3 11051.2,5259.7 11051.2,5289.7 11058.7,5290.9 11066.1,5292.9 11073.2,5295.7 11079.9,5299.2 11086.3,5303.4 11092.2,5308.2 11097.6,5313.6 11102.4,5319.6 11106.5,5326 11109.9,5332.7 11112.7,5339.9 11114.6,5347.2 11115.8,5354.8 11116.2,5362.4
  region net MCU/3V3: 11061.2,4595.9 11069.2,4596.2 11077.2,4597.2 11085.1,4598.8 11092.8,4601 11100.4,4603.9 11107.6,4607.3 11114.6,4611.3 11121.2,4615.9 11131.2,4585.9 11121.2,4555.9 11114.6,4560.5 11107.6,4564.5 11100.4,4567.9 11092.8,4570.8 11085.1,4573 11077.2,4574.6 11069.2,4575.6 11061.2,4575.9 11061.2,4595.9
  region net MCU/3V3: 11141.2,5234 11121.2,5234 11121.1,5249 11120.7,5264 11141.7,5264 11141.3,5249 11141.2,5234
  region net MCU/3V3: 11236.2,5335.9 11225.5,5335.5 11214.8,5334.4 11204.3,5332.5 11193.9,5329.8 11183.7,5326.4 11173.8,5322.3 11164.2,5317.5 11155,5312 11146.2,5305.9 11131.2,5350.9 11236.2,5335.9
  region net MCU/GND: 120 vertices and 18 holes, not listed, extent 9862.5,3020 11953.1,5629.6
  region net MCU/GND: 11057.1,4016.8 11077.3,3996.6 11080.2,3994.2 11083.5,3992.5 11087.1,3991.4 11090.8,3991 11099.4,3991 11100.2,3990.7 11101.4,3990.2 11102.6,3989.5 11103.8,3988.7 11104.7,3988.1 11105.5,3987.3 11106.5,3986.4 11107.5,3985.5 11104.2,3982.3 11101.3,3978.6 11099,3974.5 11097.3,3970.1 11096.2,3965.6 11095.9,3960.9 11096.2,3956.2 11097.3,3951.7 11099,3947.3 11101.3,3943.2 11104.2,3939.5 11107.6,3936.3 11106.5,3935.4 11105.5,3934.5 11104.7,3933.7 11103.8,3933.1 11102.6,3932.3 11101.4,3931.7 11100.2,3931.1 11099.3,3930.8 11097.1,3930.8 11011.1,4016.8
  region net BAT/3V3: 12312.6,4105.9 12311.7,4065.9 12304.7,4065.7 12298.3,4065.3 12293.4,4064.7 12291.8,4064.3 12291,4064 12291.9,4108.3 12292.8,4107.8 12294.4,4107.4 12299.3,4106.6 12305.7,4106.1
  region net BAT/$1N16: 12580.2,3611.4 12573.1,3604.4 12571.6,3605.4 12569.3,3606.4 12566.8,3607.1 12564.3,3607.5 12577,3620.2 12577.4,3617.8 12578.2,3615.2 12579.1,3613
  region net BAT/$1N16: 12834.5,3577.1 12827.5,3584.2 12828.5,3585.7 12829.5,3587.9 12830.2,3590.5 12830.6,3593 12843.3,3580.2 12840.9,3579.8 12838.3,3579.1 12836.1,3578.1
  region net BAT/$1N14: 12827.3,3631 12834.4,3624 12833.3,3622.4 12832.4,3620.2 12831.6,3617.6 12831.2,3615.2 12818.5,3627.9 12821,3628.3 12823.5,3629 12825.8,3630
  region net BAT/SDA_B: 12557.6,3732.3 12567.6,3732.3 12567.9,3730.4 12568.8,3728.2 12570.1,3725.8 12571.6,3723.8 12553.6,3723.8 12555,3725.8 12556.3,3728.2 12557.2,3730.4
  region net BAT/SCL_B: 12592.6,3722.3 12602.6,3722.3 12602.9,3720.4 12603.8,3718.2 12605.1,3715.8 12606.6,3713.8 12588.6,3713.8 12590,3715.8 12591.3,3718.2 12592.2,3720.4
  region net BAT/VBUS: 12515.4,3500.3 12540.5,3510.7 12546.8,3505.1 12528.4,3501.4 12528.5,3501.7 12528.3,3501.9 12527.2,3501.9 12523.3,3500.8 12520.9,3500.2 12518.6,3499.8 12516.7,3499.8 12516,3500
  region net BAT/3V3: 12452.5,4426.8 12460.7,4447 12462.8,4444.9 12464.9,4443.2 12466.4,4442 12467.3,4441.7 12462.3,4424.7 12461.6,4425.2 12460.6,4425.5 12457.9,4425.5 12456.3,4425.6 12454.9,4425.8 12453.5,4426.1
  region net BAT/3V3: 12505.7,4448.2 12519.8,4434 12518.4,4432.4 12517,4430.8 12514.7,4427.5 12512.7,4424.5 12511,4422.4 12494.1,4439.4 12496.2,4441.1 12499.1,4443 12502.4,4445.4 12504.1,4446.7
  region net BAT/SCL_B: 12601.1,4159.4 12594,4152.4 12593.1,4152.8 12591.3,4153.3 12589.1,4153.7 12586.8,4153.9 12599.5,4166.7 12599.8,4164.3 12600.2,4162.1 12600.6,4160.4
  region net BAT/SDA_B: 12542.6,4234.6 12532.6,4234.6 12532.2,4236.4 12531.3,4238.6 12530,4241 12528.6,4243 12546.6,4243 12545.1,4241 12543.8,4238.6 12542.9,4236.4
  region net BAT/$1N14: 12877.6,3869.6 12867.6,3869.6 12867.2,3871.4 12866.3,3873.6 12865,3876 12863.6,3878 12881.6,3878 12880.1,3876 12878.8,3873.6 12877.9,3871.4
  region net BAT/3V3: 12509.6,4423.8 12495.5,4438 12494.8,4441.4 12493.5,4444.6 12491.7,4447.5 12489.3,4450.1 12486.5,4452.2 12483.4,4453.7 12480.1,4454.6 12476.6,4455 12526.6,4475 12590.7,4455 12581.9,4454.6 12573,4453.7 12564.3,4452 12555.7,4449.8 12547.3,4446.9 12539.1,4443.4 12531.2,4439.3 12523.7,4434.7 12516.4,4429.5 12509.6,4423.8
  region net BAT/3V3: 12509.6,4423.8 12495.5,4438 12495.7,4439.9 12495.3,4441.8 12494.4,4443.4 12493,4444.8 12491.3,4445.6 12489.4,4445.9 12537.6,4445.9 12530.1,4441 12523,4435.7 12516.1,4430 12509.6,4423.8
  region net BAT/GND: 5 vertices and 12 holes, not listed, extent 12146.7,3020 13102.7,4566.6
  region net MMU/3V3: 12222.6,5351.6 12202.6,5350.4 12202.3,5355.9 12202.1,5357.9 12201.8,5358.8 12219.4,5360 12219.2,5359.4 12219.5,5358.6 12220.6,5356.5 12221.9,5354.1 12222.4,5352.9
  region net MMU/3V3: 12202.6,5384.6 12222.6,5383.4 12222.4,5382.1 12221.9,5380.9 12220.6,5378.5 12219.5,5376.4 12219.2,5375.6 12219.4,5375 12201.8,5376.2 12202.1,5377.1 12202.3,5379.1
  region net MMU/3V3: 12202.6,5348 12222.6,5348 12222.6,5345.8 12222.9,5343.7 12223.6,5339.7 12224.3,5336.2 12224.6,5333.6 12200.6,5333.6 12200.9,5336.2 12201.6,5339.7 12202.2,5343.7 12202.5,5345.8
  region net MMU/SDA: 12312.6,5353.7 12302.6,5353.7 12302.2,5355.5 12301.3,5357.7 12300,5360.1 12298.6,5362.1 12316.6,5362.1 12315.1,5360.1 12313.8,5357.7 12312.9,5355.5
  region net MMU/IMU_INT: 12350.6,5452.1 12357.7,5445 12356.6,5443.5 12355.7,5441.3 12354.9,5438.7 12354.5,5436.3 12341.8,5449 12344.3,5449.4 12346.8,5450.1 12349.1,5451.1
  region net MMU/3V3: 12342,5505 12351.7,5525 12352.9,5524.7 12354.1,5524 12355.3,5523 12356.4,5521.8 12358.4,5519.7 12359.3,5519 12360.1,5518.8 12350.4,5504 12349.6,5504.4 12347.7,5504.7 12345.1,5504.9
  region net MMU/3V3: 12372.5,5525 12382.1,5505 12379.1,5504.9 12376.4,5504.7 12374.5,5504.4 12373.7,5504 12364.1,5518.8 12364.9,5519 12365.8,5519.7 12367.8,5521.8 12368.9,5523 12370,5524 12371.2,5524.7
  region net MMU/SDA: 12454.5,5309.9 12447.5,5317 12448.5,5318.5 12449.5,5320.7 12450.2,5323.3 12450.6,5325.8 12463.3,5313 12460.9,5312.6 12458.3,5311.9 12456.1,5310.9
  region net MMU/IMU_INT: 12497.6,5450 12507.6,5450 12508.8,5448.2 12511.6,5445 12493.6,5445 12496.3,5448.2
  region net MMU/3V3: 12557.6,5496.3 12567.6,5496.3 12567.9,5494.5 12568.8,5492.3 12570.1,5489.9 12571.6,5487.9 12553.6,5487.9 12555,5489.9 12556.3,5492.3 12557.2,5494.5
  region net MMU/3V3: 12652.6,5496.3 12662.6,5496.3 12662.9,5494.5 12663.8,5492.3 12665.1,5489.9 12666.6,5487.9 12648.6,5487.9 12650,5489.9 12651.3,5492.3 12652.2,5494.5
  region net MMU/3V3: 12867.6,5394.4 12887.6,5394.4 12887.6,5392.3 12887.9,5390.1 12888.6,5386.1 12889.3,5382.7 12889.6,5380 12865.6,5380 12865.9,5382.7 12866.6,5386.1 12867.2,5390.1 12867.5,5392.3
  region net MMU/3V3: 12557.6,5480 12557.2,5484.3 12556.1,5488.6 12554.2,5492.5 12551.7,5496.1 12548.6,5499.2 12545.1,5501.7 12541.1,5503.5 12536.9,5504.6 12532.6,5505 12560.9,5515 12592.6,5505 12588.2,5504.6 12584,5503.5 12580.1,5501.7 12576.5,5499.2 12573.4,5496.1 12570.9,5492.5 12569.1,5488.6 12567.9,5484.3 12567.6,5480
  region net MMU/3V3: 12662.6,5480 12652.6,5480 12652.2,5484.3 12651.1,5488.6 12649.2,5492.5 12646.7,5496.1 12643.6,5499.2 12640.1,5501.7 12636.1,5503.5 12631.9,5504.6 12627.6,5505 12659.7,5515 12687.6,5505 12683.2,5504.6 12679,5503.5 12675.1,5501.7 12671.5,5499.2 12668.4,5496.1 12665.9,5492.5 12664.1,5488.6 12662.9,5484.3
  region net MMU/GND: 5 vertices and 20 holes, not listed, extent 12146.7,5185.4 12905.9,5629.6

## Silkscreen, mask and mechanical layers (free items; w line width, h text height)
Top Silkscreen Layer:
  text "FPC1" at 12152.6,5521.3 h45
  text "C4" at 12372.6,5511.3 h45
  text "C3" at 12487.6,5511.3 h45
  text "C5" at 12827.6,5505 h45 r270
  text "R2" at 12532.6,5485 h45 r270
  text "C6" at 12622.6,5465 h45
  text "R1" at 12587.6,5435 h45 r270
  text "3V3 IN" at 9905,5365.9 h45
  text "U1" at 12462.6,5325 h45 r270
  text "U2" at 12697.6,5315 h45 r180
  text "IMU" at 12327.6,5276.3 h45
  text "MMU" at 12737.6,5271.3 h45
  text "- +" at 10075,5035.9 h45 r270
  text "E R T G / B G 3 5" at 11095,4805.9 h45 r90
  text "GVRRV →" at 11065,4645.9 h45 r270
  text "TO MB" at 12467.6,4515.9 h45
  text "FPC1" at 12402.6,4455.9 h45 r90
  text "C9" at 12712.6,4410.9 h45 r90
  text "R12" at 12702.6,4335.9 h45 r90
  text "LCD" at 11060,4285.9 h45 r270
  text "R14" at 12397.6,4275.9 h45
  text "R11" at 12637.6,4270.9 h45 r90
  text "C10" at 12932.6,4250.9 h45 r90
  text "U3" at 12147.6,4245.9 h45 r270
  text "G 3V3" at 12402.6,4190.9 h45 r270
  text "R13" at 12407.6,4190.9 h45
  text "U2" at 12917.6,4110.9 h45 r90
  text "3V3" at 12187.6,4070.9 h45 r90
  text "R7" at 12922.6,3996.9 h45 r90
  text "U4" at 12147.6,3990.9 h45 r270
  text "1 G / 2 SCL / 3 SDA / 4-5 G / 6-8 3V3" at 12467.6,3940.9 h45
  text "SW" at 11380,3925.9 h45 r90
  text "G  B" at 12407.6,3925.9 h45 r270
  text "C8" at 12797.6,3905.9 h45
  text "C7" at 12752.6,3860.9 h45 r270
  text "BAT" at 12187.6,3820.9 h45 r90
  text "R6" at 12935.7,3820 h45 r90
  text "R8" at 12992.6,3815.9 h45 r90
  text "GNSS ANT" at 11815,3765.9 h45 r270
  text "L1" at 12992.6,3750.9 h45 r270
  text "C6" at 12757.6,3745.9 h45
  text "R1" at 12876.6,3738.4 h45 r270
  text "C1" at 12662.9,3727.3 h45 r180
  text "USB1" at 12448.5,3725.7 h45 r270
  text "UART2" at 10030,3716.9 h45
  text "R3" at 12827.6,3615.9 h45 r270
  text "R2" at 12473.6,3563.4 h45 r90
  text "IMU" at 10325,3560.9 h45
  text "R5" at 12482.6,3525.9 h45 r270
  text "U1" at 12592.6,3520.9 h45 r90
  text "C4" at 12682.6,3470.9 h45
  text "C2" at 12877.6,3460.9 h45 r270
  text "C5" at 12562.6,3375.9 h45 r270
  text "GT-IO18 / GR-IO17" at 10910,3330.9 h30
  text "IIC 0x4B" at 12812.6,3315.9 h45
  text "C3" at 12357.6,3280.9 h45
  text "UART2  / G 3V3 IO4 IO5 G" at 9865,3225.9 h40
  text "R4" at 12647.6,3205.9 h45 r270
  text "Q1" at 12407.6,3180.9 h45
  text "R9" at 12637.6,3060.9 h45
  text "R10" at 12307.6,3055.9 h45
Bottom Silkscreen Layer:
  text "IMU 0x6A / MMU 0x30" at 12437.6,5261.3 h45
  text "U6 1117-3.3 / R9 0R 0603 / C10 10uf 0603 / C11 22uf 3216" at 11868.4,4883.1 h45
  text "M3" at 12877.6,4305.9 h45 r45
  text "LOGIC: 3.3V /  / LCD: CLK12 DIN11 CS13 /      DC14 RST10 TE21 /  / SD:  CLK40 MOSI41 MISO39 CS42 /  / SENSOR: SDA6 SCL7 / IMU: 0x6A  INT15 / MAG: 0x30  INT16 /  / POWER I2C: SDA2 SCL1 /  / GNSS: TX17 RX18 /  / KEY: SW1=47 SW2=48 /      SW3=9  SW4=8  ACTIVE LOW /  / RESET: EN=LOW / DOWNLOAD: IO0=LOW + RESET" at 11070,3725.9 h60
Mechanical Layer:
  drawing of 1000 lines, arcs and shapes, not listed
Document Layer:
  text "V-CUT / CNC | NO EXTERNAL RAILS" at 10274.3,5726.4 h27.6
  text "89.3 x 67.1 mm | MCU + BAT + MMU" at 10274.3,5679.1 h31.5